# Altium PCB PCB_A1.PcbDoc (part 1 of 2)
Units mil, origin at the board's own origin, x right, y up, seen from the top; angles counter-clockwise.
Board outline 2000 x 2550 mil, 4 copper layers (Top Layer, GND, 3V3, Bottom Layer), stack 61.818 mil thick; 74 components, 52 nets, 287 pads, 163 vias.
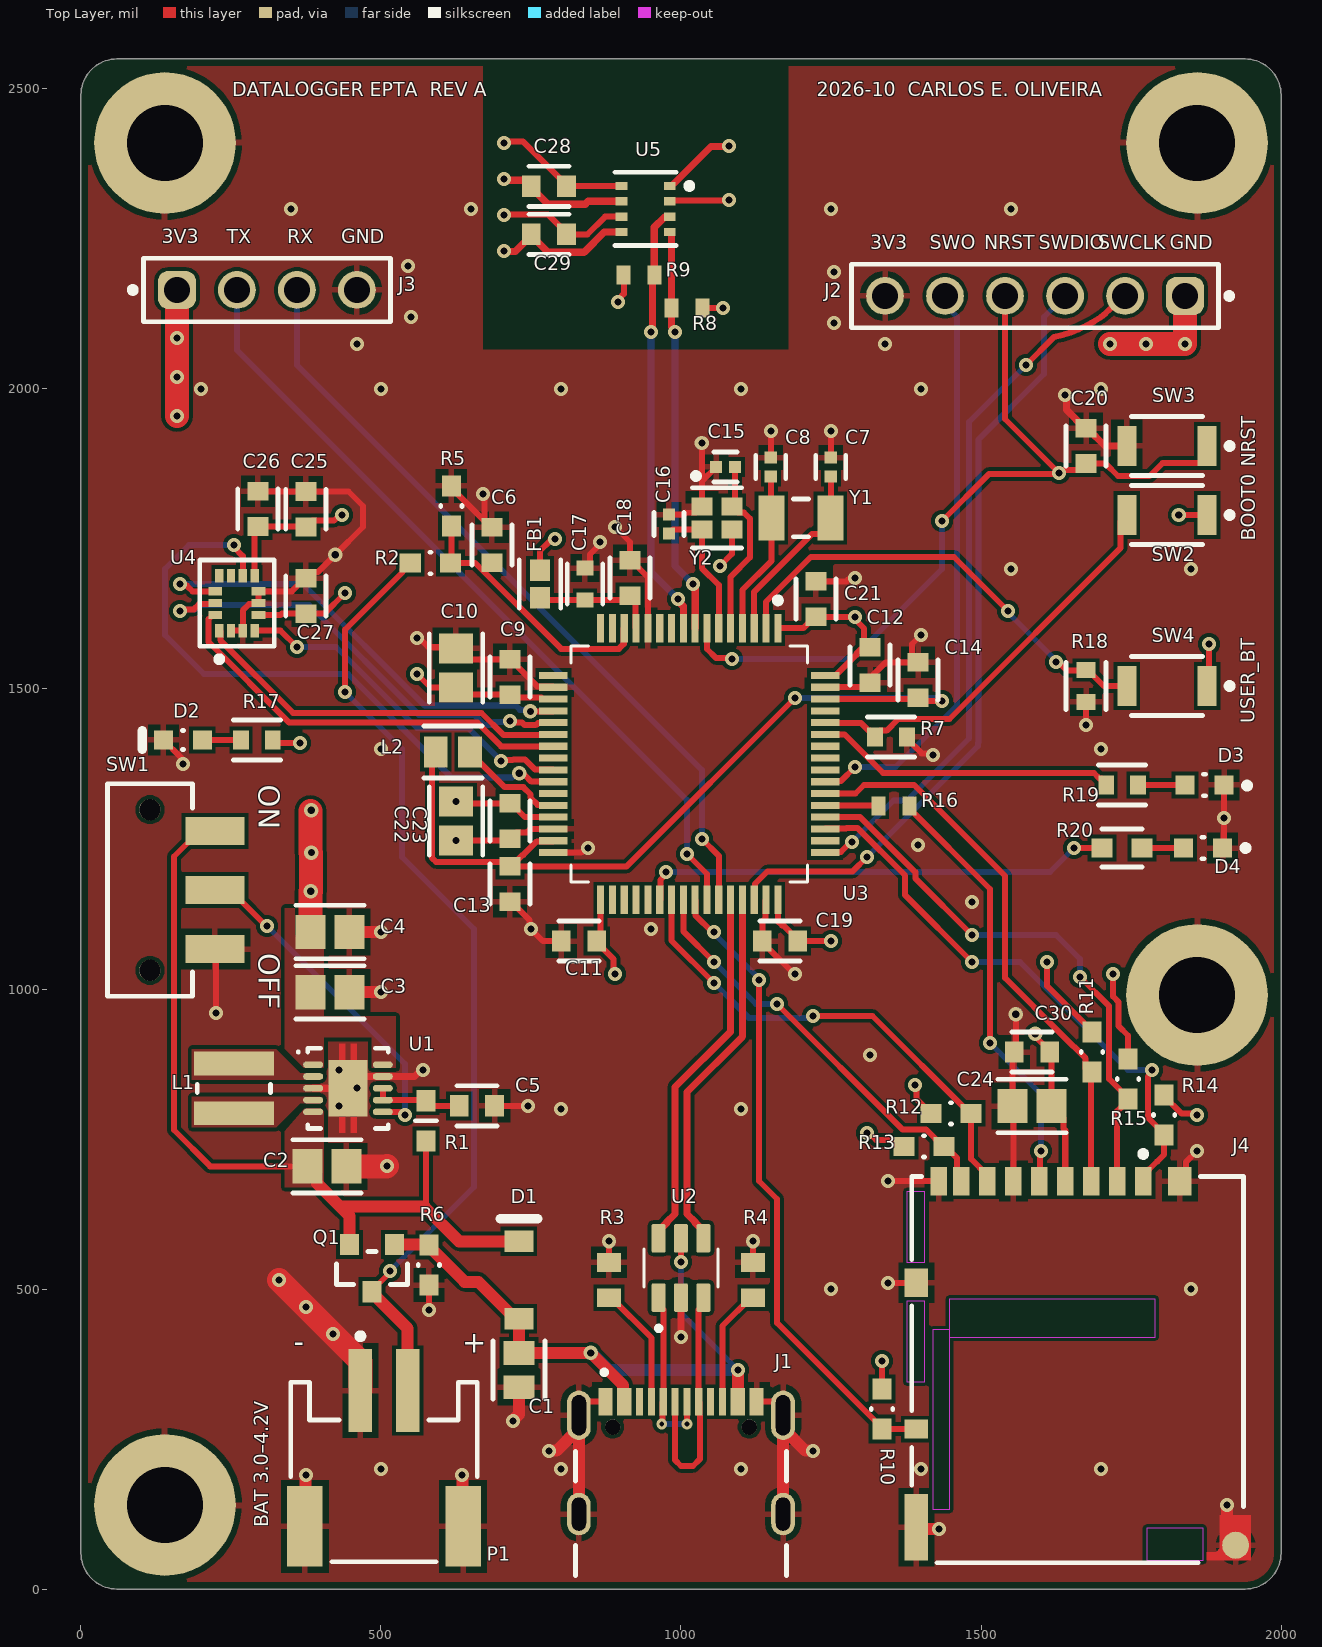
[diagram p0: Top Layer view]
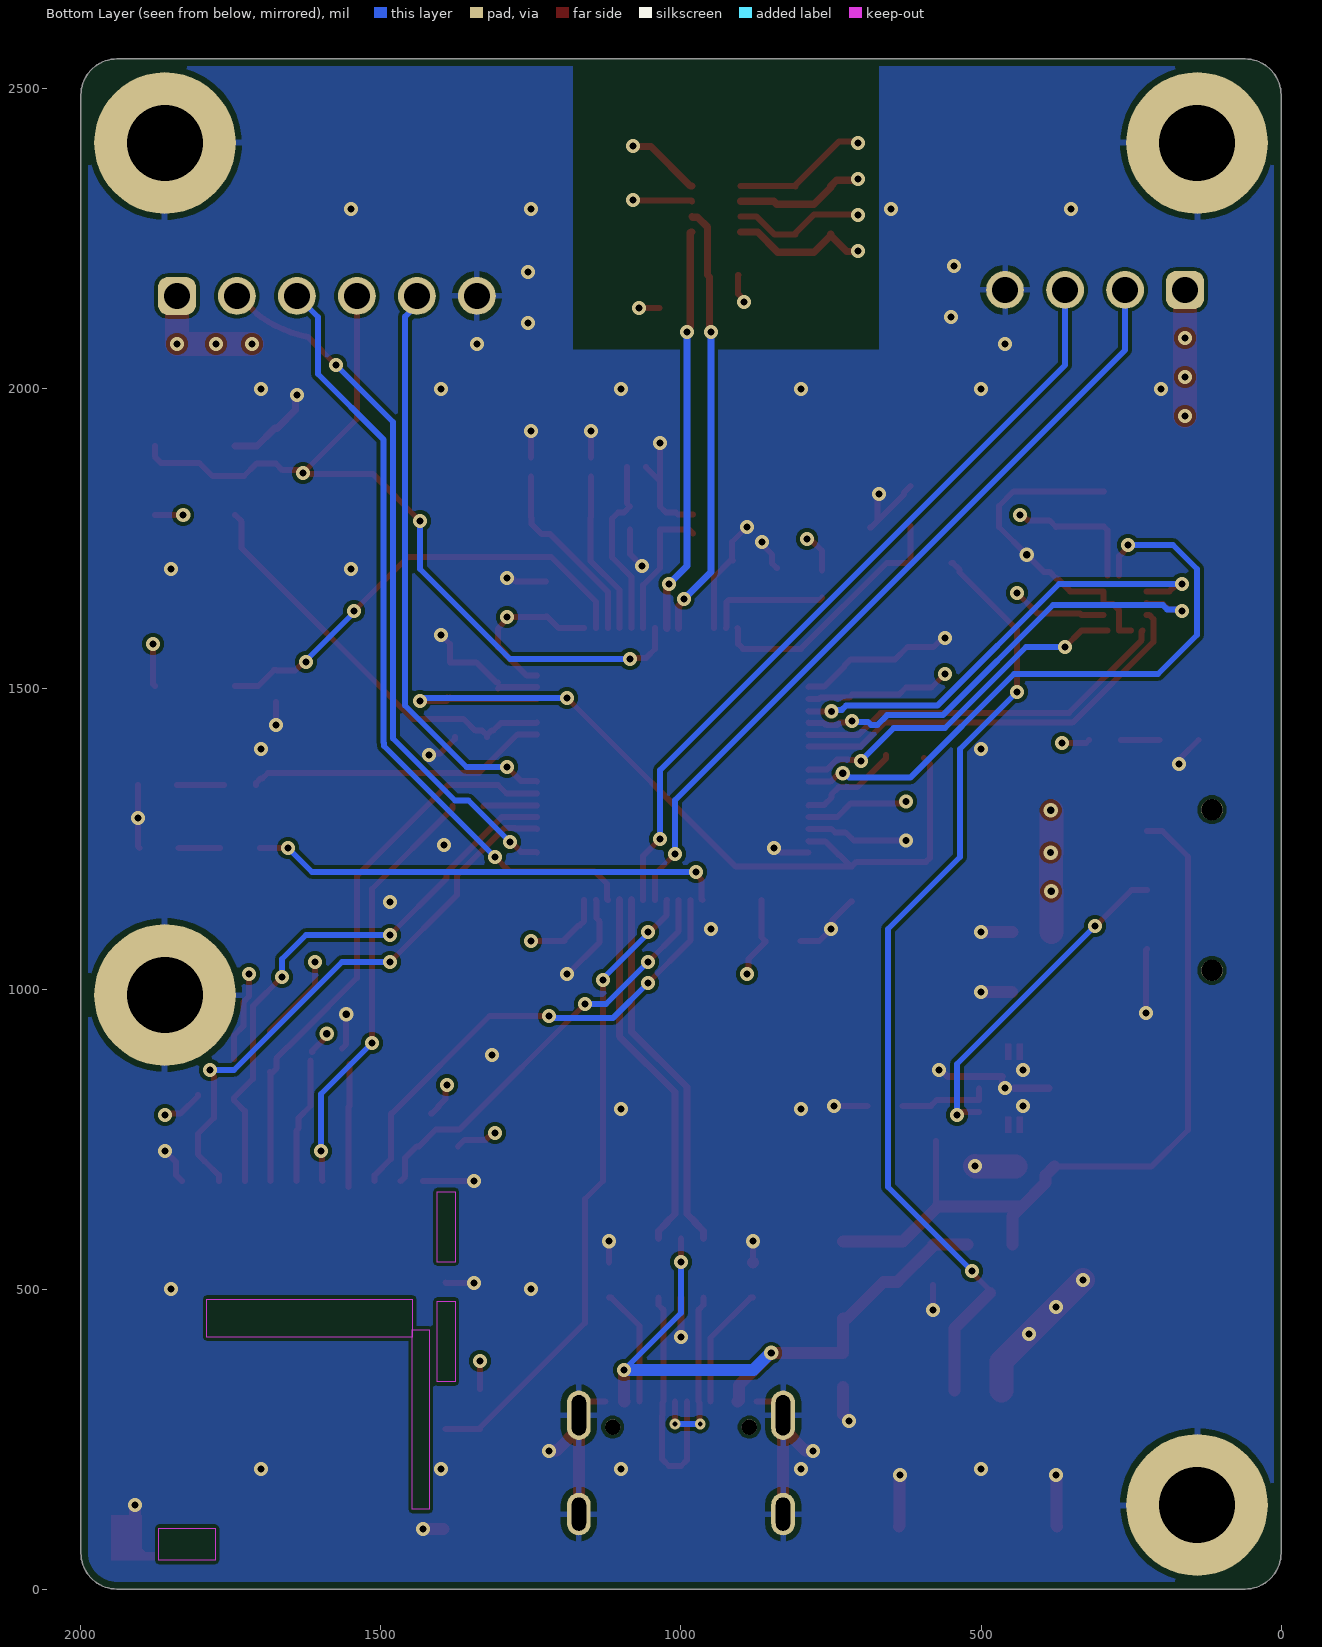
[diagram p1: Bottom Layer view, seen from below]
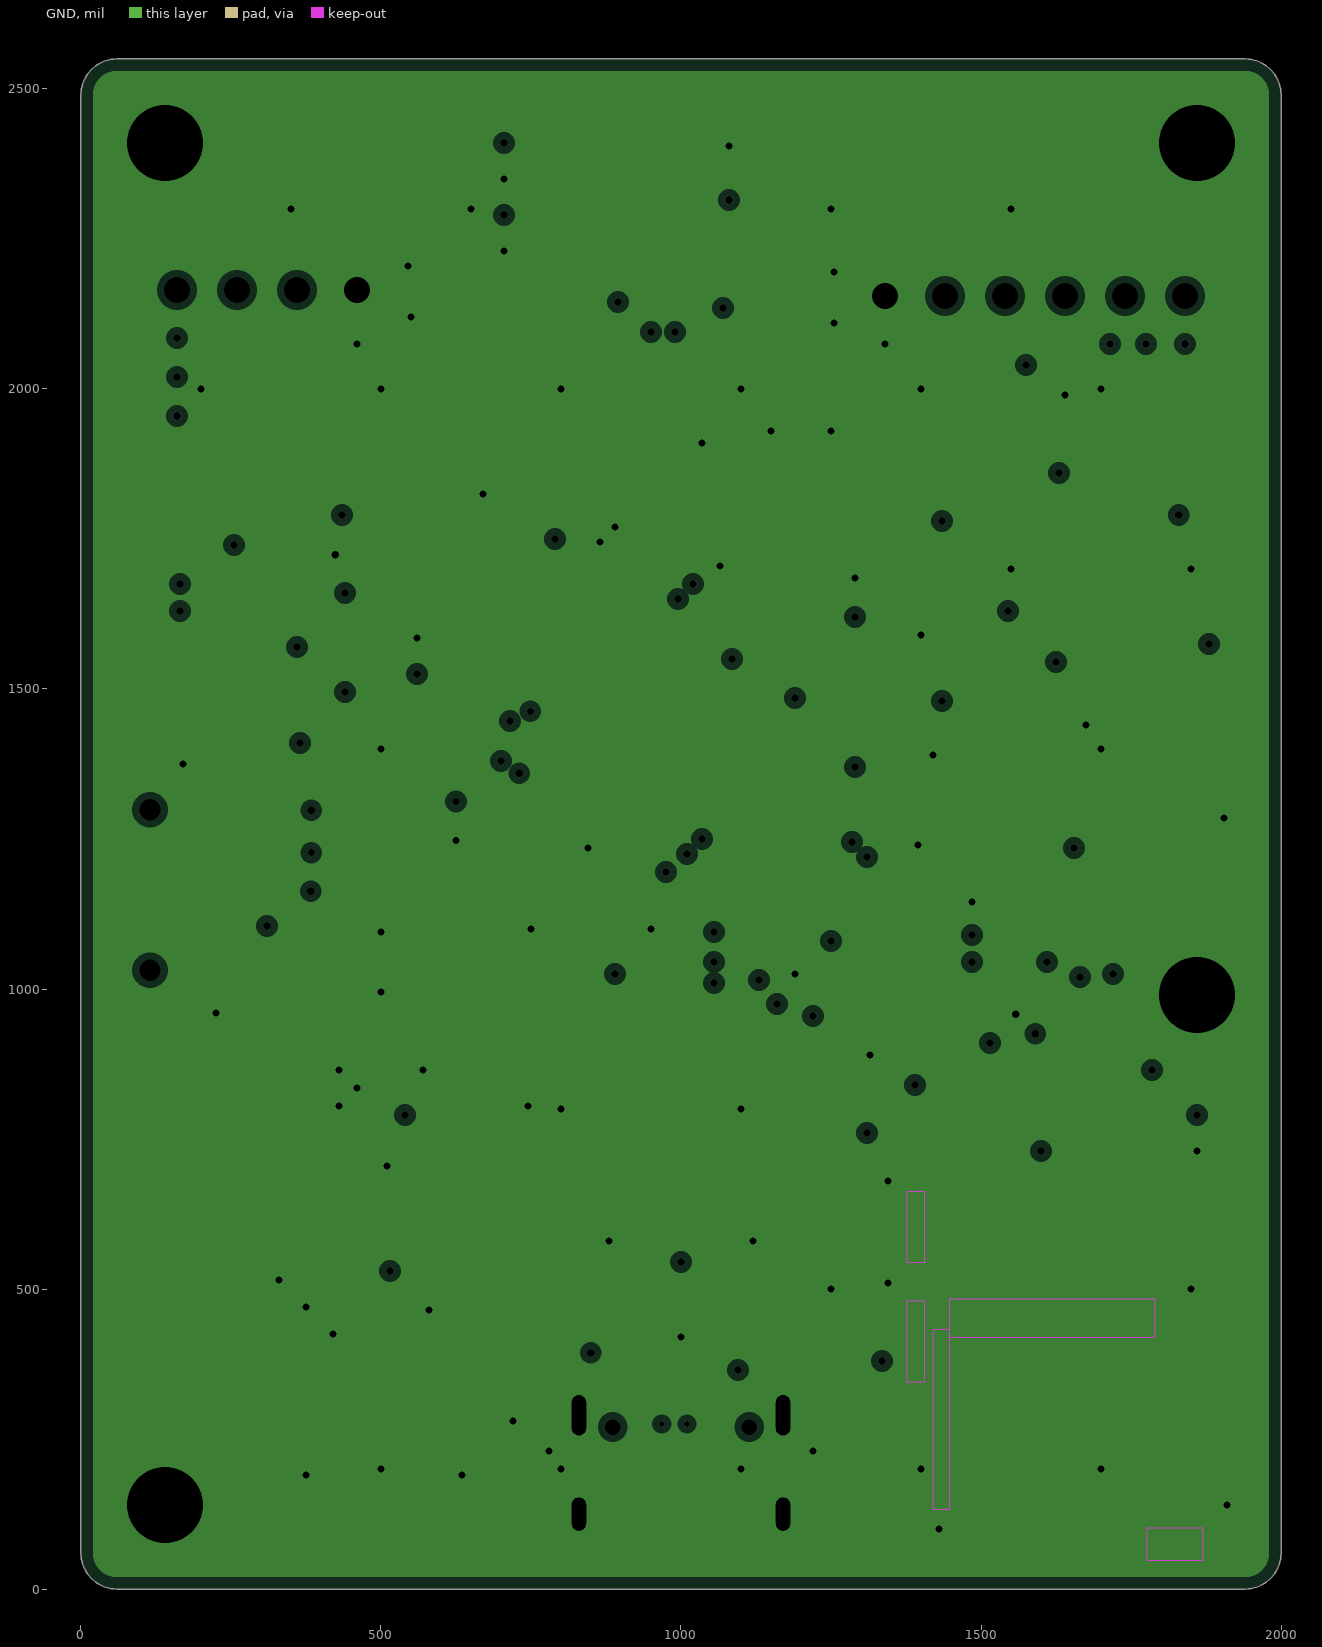
[diagram p2: GND, clearances drawn from the general rule]
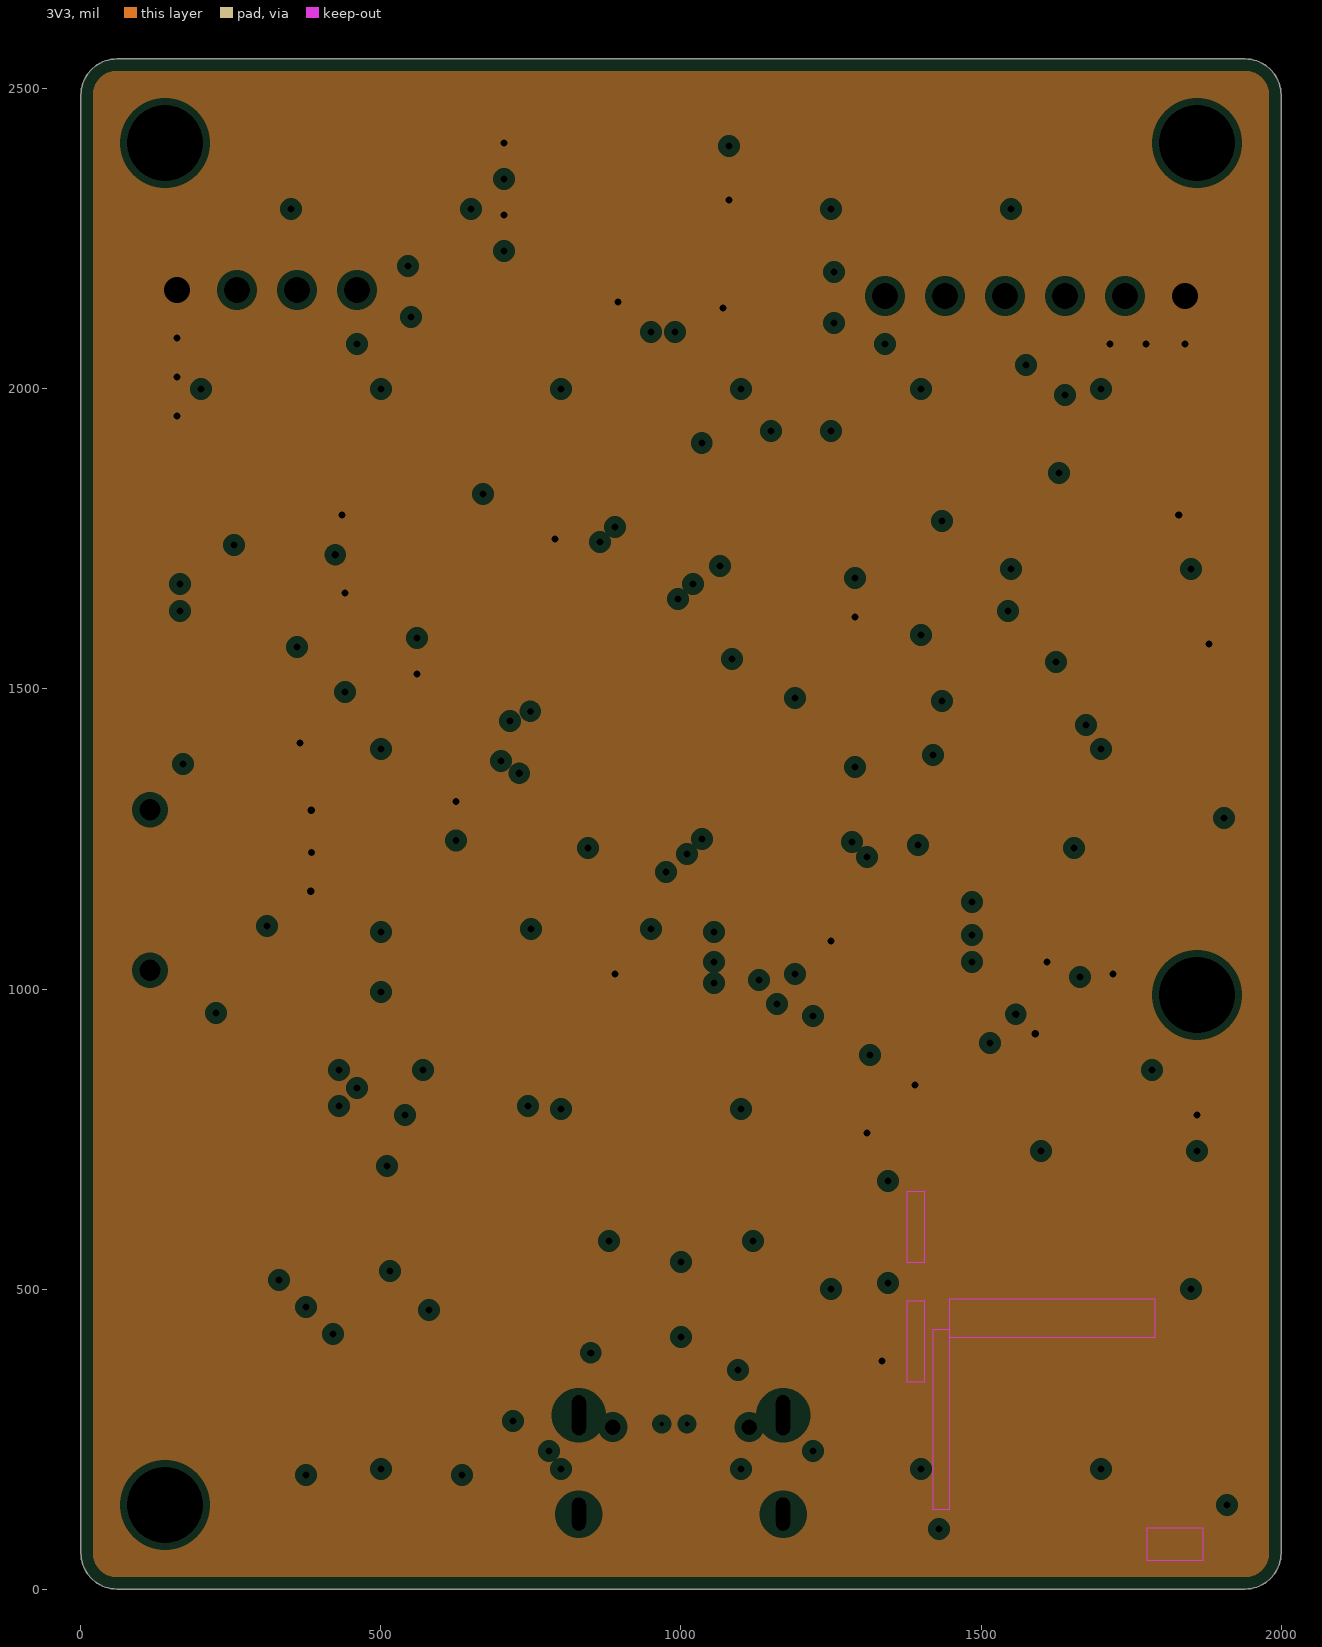
[diagram p3: 3V3, clearances drawn from the general rule]

## Layer stack, top to bottom
Top Solder: solder mask 0.4, Solder Resist, Dk 3.8
Top Layer: signal copper 1.38
Dielectric 1: prepreg 3.94, PP-006, Dk 4.05
GND: plane copper 0.689, net GND
Dielectric 2: dielectric 49.8, FR-4, Dk 4.8
3V3: plane copper 0.689, net 3V3
Dielectric 3: prepreg 3.94, PP-006, Dk 4.05
Bottom Layer: signal copper 1.38
Bottom Solder: solder mask 0.4, Solder Resist, Dk 3.8

## Board outline
0,60 0,2490 cw(c60,2490) 60,2550 1940,2550 cw(c1940,2490) 2000,2490 2000,60 cw(c1940,60) 1940,0 60,0 cw(c60,60)
cut-out: 6372.5,4767.5 6370,4767.5

## Design rules (kind name [scope] priority, off if disabled: settings)
AssemblyTestPointUsage [All] p1 off:
BoardOutlineClearance [All] p1: gap=12 ignorepadtopadclearanceinfootprint=FALSE
Clearance Clearance_Polygon [InPolygon] p1: gap=6 ignorepadtopadclearanceinfootprint=TRUE
Clearance [All] p2: gap=6 ignorepadtopadclearanceinfootprint=TRUE
DiffPairsRouting DiffPair_USB [InDifferentialPairClass('USB_DIFF')] p1: maxlimit=200 minlimit=6 mostfreqgap=8 toplayer_minwidth=8 toplayer_maxwidth=12 toplayer_prefwidth=10 bottomlayer_minwidth=8 bottomlayer_maxwidth=12 bottomlayer_prefwidth=10 maxuncoupledlength=500
DiffPairsRouting [All] p2: maxlimit=200 minlimit=6 mostfreqgap=8 toplayer_minwidth=8 toplayer_maxwidth=12 toplayer_prefwidth=10 bottomlayer_minwidth=8 bottomlayer_maxwidth=12 bottomlayer_prefwidth=10 maxuncoupledlength=500
FabricationTestPointUsage [All] p1 off: valid=0 allowmultiple=FALSE
HoleSize HoleSize_USB [IsVia and InNet('USB_DM_NET')] p1: absolutevalues=TRUE maxlimit=12 minlimit=8 maxpercent=80.000 minpercent=20.000
HoleSize [All] p2: absolutevalues=TRUE maxlimit=248 minlimit=12 maxpercent=80.000 minpercent=20.000
HoleToHoleClearance [All] p1: gap=20 allowstackedmicrovias=TRUE
MinimumAnnularRing MinimumAnnularRing_USB [IsVia and InNet('USB_DM_NET')] p1: minimumring=5
MinimumAnnularRing [All] p2: minimumring=6
MinimumSolderMaskSliver MinimumSolderMaskSliver_FinePitch [InComponent('U3') or InComponent('U1') or InComponent('U4') or InComponent('U5') or InComponent('J1') or InComponent('Y2')] p1: minsoldermaskwidth=0
MinimumSolderMaskSliver MinimumSolderMaskSliver_U5A5 [HasFootprint('LQFP64-5W_MFG')] p2: minsoldermaskwidth=3
MinimumSolderMaskSliver [All] p3: minsoldermaskwidth=8
PlaneClearance [All] p1: clearance=12
PlaneConnect PlaneConnect_Vias [IsVia] p1: planeconnectstyle=Direct reliefexpansion=20 reliefentries=4 reliefconductorwidth=10 reliefairgap=10
PlaneConnect [All] p2: planeconnectstyle=Relief reliefexpansion=20 reliefentries=4 reliefconductorwidth=10 reliefairgap=10
PolygonConnect PolygonConnect_Vias [IsVia] p1: connectstyle=Direct reliefconductorwidth=10 reliefentries=4 polygonreliefangle="90 Angle" airgapwidth=10
PolygonConnect PolygonConnect_Power [InNet('VSYS') or InNet('NetL1_1') or InNet('NetL1_2') or InNet('3V3') or InComponent('U1') or InComponent('L1')] p2: connectstyle=Direct reliefconductorwidth=10 reliefentries=4 polygonreliefangle="90 Angle" airgapwidth=10
PolygonConnect [All] p3: connectstyle=Relief reliefconductorwidth=10 reliefentries=4 polygonreliefangle="90 Angle" airgapwidth=10
RoutingVias RoutingVias_USB [IsVia and InNet('USB_DM_NET')] p1: holewidth=8 width=18 viastyle="Through Hole" minholewidth=8 minwidth=18 maxholewidth=8 maxwidth=18
RoutingVias [All] p2: holewidth=12 width=24 viastyle="Through Hole" minholewidth=12 minwidth=24 maxholewidth=12 maxwidth=24
SilkToSilkClearance [All] p1: silktosilkclearance=6
SilkToSolderMaskClearance [IsPad] p1: minsilkscreentomaskgap=6 clearancetoexposedcopper=TRUE
SolderMaskExpansion Tented_Vias [IsVia] p1: expansion=0 istentingtop=TRUE useseparateexpansions=TRUE expansionbottom=0 istentingbottom=TRUE
SolderMaskExpansion [All] p2: expansion=2 istentingtop=FALSE useseparateexpansions=TRUE expansionbottom=2 istentingbottom=FALSE
SupplyNets "Schematic Supply Nets_5" [InNet('3V3')] p1: voltage=0.000
SupplyNets "Schematic Supply Nets_4" [InNet('VBUS')] p2: voltage=0.000
SupplyNets "Schematic Supply Nets_2" [InNet('VBAT')] p3: voltage=0.000
SupplyNets "Schematic Supply Nets_1" [InNet('GND')] p4: voltage=0.000
SupplyNets "Schematic Supply Nets" [InNet('VSYS')] p5: voltage=0.000
Width Width_Power [InNet('VBUS') or InNet('VSYS') or InNet('VBAT') or InNet('3V3')] p1: maxlimit=100 minlimit=10 preferedwidth=20 minimp=50.000000 maximp=50.000000 favimp=50.000000
Width [All] p2: maxlimit=100 minlimit=6 preferedwidth=10 minimp=50.000000 maximp=50.000000 favimp=50.000000
20 further rules are at their usual default settings.

## Classes and differential pairs
differential pair class USB_DIFF: USB USB_CONN
component class SENSORS: C25 C26 C27 C28 C29 R8 R9 U4 U5
component class POWER: C1 C2 C3 C4 C5 C6 D1 J1 L1 Q1 R1 R2 R3 R4 R5 R6 SW1 U1 U2
component class microSD: C24 C30 J4 R10 R11 R12 R13 R14 R15 R16
component class MCU_U5A5: C7 C8 C9 C10 C11 C12 C13 C14 C15 C16 C17 C18 C19 C20 C21 C22 C23 FB1 J2 J3 L2 R7 SW2 SW3 U3 Y1 Y2
component class INTERFACE: D2 D3 D4 R17 R18 R19 R20 SW4
differential pair USB_CONN: +USB_DP_NET -USB_DM_NET
differential pair USB: +USB_DP -USB_DM

## Components (designator, comment, footprint, x,y, rotation, side; value= is the part's Value field where it differs from the comment)
C1 "GRM219R61E475KA73D" FP-GRM219-0_15-0_1-IPC_C 730,365 r270 top
C2 "GRM21BZ71E106KE15K" FP-GRM21B-0_2-e0_2_0_7-IPC_B 410,704.53 r0 top value=10uF
C3 "GRM21BZ71E106KE15K" FP-GRM21B-0_2-e0_2_0_7-IPC_B 415,994.53 r0 top value=10uF
C4 "GRM21BZ71E106KE15K" FP-GRM21B-0_2-e0_2_0_7-IPC_B 415,1095 r0 top value=10uF
C5 "CC0603KRX7R9BB104" FP-CC0603-DA-MFG 660,805.32 r0 top value="100 nF"
C6 "CC0603KRX7R9BB104" FP-CC0603-DA-MFG 685,1740 r90 top value="100 nF"
C7 "C0402C829D5GACTU" FP-C0402-BB-MFG 1249.68,1870 r90 top value="8.2 pF"
C8 "C0402C829D5GACTU" FP-C0402-BB-MFG 1149.68,1870 r90 top value="8.2 pF"
C9 "CC0603KRX7R9BB104" FP-CC0603-DA-MFG 715,1520 r90 top value="100 nF"
C10 "GRM21BZ71E106KE15K" FP-GRM21B-0_2-e0_2_0_7-IPC_B 625,1535 r90 top value=10uF
C11 "CC0603KRX7R9BB104" FP-CC0603-DA-MFG 830,1080 r180 top value="100 nF"
C12 "CC0603KRX7R9BB104" FP-CC0603-DA-MFG 1315,1540 r270 top value="100 nF"
C13 "CC0603KRX7R7BB225" FP-CC0603-DA-MFG 715,1175 r270 top value="2.2 uF"
C14 "CC0603KRX7R7BB225" FP-CC0603-DA-MFG 1395,1515 r90 top value="2.2 uF"
C15 "C0402C100C5GACTU" FP-C0402-BB-MFG 1074.25,1870 r180 top value="10 pF"
C16 "C0402C100C5GACTU" FP-C0402-BB-MFG 980,1775 r90 top value="10 pF"
C17 "GCM188R71E105KA64D" FP-GCM188-0_1-MFG 840,1675 r90 top
C18 "CC0603KRX7R9BB104" FP-CC0603-DA-MFG 915,1685 r90 top value="100 nF"
C19 "CC0603KRX7R9BB104" FP-CC0603-DA-MFG 1165,1080 r180 top value="100 nF"
C20 "CC0603KRX7R9BB104" FP-CC0603-DA-MFG 1675,1905 r90 top value="100 nF"
C21 "CC0603KRX7R9BB104" FP-CC0603-DA-MFG 1225,1650 r90 top value="100 nF"
C22 "GRM21BZ71E106KE15K" FP-GRM21B-0_2-e0_2_0_7-IPC_B 625,1280 r270 top value=10uF
C23 "CC0603KRX7R9BB104" FP-CC0603-DA-MFG 715,1280 r270 top value="100 nF"
C24 "GRM21BZ71E106KE15K" FP-GRM21B-0_2-e0_2_0_7-IPC_B 1585,805 r180 top value=10uF
C25 "CC0603KRX7R7BB225" FP-CC0603-DA-MFG 375,1799.53 r270 top value="2.2 uF"
C26 "CC0603KRX7R9BB104" FP-CC0603-DA-MFG 295,1800 r90 top value="100 nF"
C27 "CC0603KRX7R9BB104" FP-CC0603-DA-MFG 375,1655 r90 top value="100 nF"
C28 "CC0603KRX7R9BB104" FP-CC0603-DA-MFG 780,2337.72 r180 top value="100 nF"
C29 "CC0603KRX7R9BB104" FP-CC0603-DA-MFG 780,2257.72 r180 top value="100 nF"
C30 "CC0603KRX7R9BB104" FP-CC0603-DA-MFG 1585,895 r180 top value="100 nF"
D1 "B5819W" MCC-SOD123_V 730,515 r90 top
D2 "APT1608SGC" KING-APT1608SGC_V 170,1415 r180 top
D3 "APT1608EC" FP-APT1608EC-MFG 1872.52,1340 r180 top
D4 "APT1608QBC/D" FP-APT1608QBC-D-MFG 1870,1235 r180 top
FB1 "BLM18PG221SH1D" FP-BLM18-0_15-t0_8-IPC_C 765,1675 r270 top
J1 "USB4105-GF-A" GCT_USB4105-GF-A 1000,125 r0 top
J2 "61300611121" 61300611121 1590,2155 r180 top
J3 "61300411121" 61300411121 310,2165 r0 top
J4 "DM3AT-SF-PEJM5" FP-DM3AT-SF-PEJM5-MFG 1661.06,365.87 r0 top
L1 "VLS3012HBX-2R2M" FP-VLS3012HBX-MFG 255,834.53 r90 top value=2.2uH
L2 "LQM21PN2R2MGHL" FP-LQM21PH_G0-IPC_C 620,1395 r0 top
P1 "S2B-PH-SM4-TB(LF)(SN)" "JST- S2B-PH-SM4-TB(LF)(SN)-2_V" 505,195 r0 top
Q1 "DMG2305UX-13" FP-SOT23-MFG 485,535 r270 top
R1 "RC0603FR-07100RL" FP-RC0603-0_55-MFG 575,780.32 r90 top
R2 "RC0603FR-07100KL" FP-RC0603-0_55-MFG 582.28,1710 r0 top
R3 "RC0603FR-075K1L" RESC1608X55X25ML10T15 880,515 r90 top value=5,1k
R4 "RC0603FR-075K1L" RESC1608X55X25ML10T15 1120,515 r90 top value=5,1k
R5 "RC0603FR-07100KL" FP-RC0603-0_55-MFG 617.28,1805 r90 top
R6 "RC0603FR-07100KL" FP-RC0603-0_55-MFG 580,540 r270 top
R7 "RC0603FR-0710KL" FP-RC0603-0_55-IPC_C 1350,1420 r0 top
R8 "RC0603FR-074K7L" RESC1608X55X25LL10T15 1010,2135 r0 top
R9 "RC0603FR-074K7L" RESC1608X55X25LL10T15 930,2190 r0 top
R10 "RC0603FR-0747KL" FP-RC0603FR-0747KL-MFG 1335,300 r90 top
R11 "RC0603FR-0747KL" FP-RC0603FR-0747KL-MFG 1685,895 r90 top
R12 "RC0603FR-0747KL" FP-RC0603FR-0747KL-MFG 1450,792.72 r180 top
R13 "RC0603FR-0747KL" FP-RC0603FR-0747KL-MFG 1405,737.72 r180 top
R14 "RC0603FR-0747KL" FP-RC0603FR-0747KL-MFG 1805,790 r90 top
R15 "RC0603FR-0747KL" FP-RC0603FR-0747KL-MFG 1745,850 r90 top
R16 "RC0603FR-0733RL" RESC1608X55X25LL10T15 1355,1305 r180 top
R17 "RC0603FR-071KL" FP-RC0603-0_55-IPC_C 293.36,1415 r180 top
R18 "RC0603FR-0710KL" FP-RC0603-0_55-IPC_C 1675,1505 r270 top
R19 "RC0603FR-071KL" FP-RC0603-0_55-IPC_C 1735,1340 r0 top
R20 "RT0603FRE07330RL" FP-RT0603-MFG 1735,1235 r0 top value=330Ω
SW1 "JS102011SAQN" FP-JS102011SAQN-MFG 115,1165 r270 top
SW2 "B3U-1000P" OMRON-B3U-1000_V 1810,1790 r180 top
SW3 "B3U-1000P" OMRON-B3U-1000_V 1810,1905 r180 top
SW4 "B3U-1000P" OMRON-B3U-1000_V 1810,1505 r180 top
U1 "TPS63001DRCRG4" DRC10-2400X1650TP 445,834.53 r0 top
U2 "USBLC6-2SC6" SOT95P280X145-6N 1000,535 r90 top
U3 "STM32U5A5RJT6Q" LQFP64-5W_MFG 1013.78,1375 r270 top
U4 "LSM6DSOXTR" FP-LGA-14L-DM00249496-MFG 260,1643.13 r90 top
U5 "BME280" FP-BME280-MFG 941.06,2300 r0 top
Y1 "ABS07-32.768KHZ-7-T" FP-ABS07-MFG 1199.68,1785 r180 top
Y2 "ABM11W-16.0000MHZ-8-K1Z-T3" FP-ABM11W-MFG 1060,1785 r180 top

## Footprints (in the part's own frame and the unit in brackets; to place one, negate y for a bottom-side part, rotate by r counter-clockwise, add the part's x,y. Pads: shape width x height; smd on the part's side, far side on the other; paste and mask are expansions set on the pad)
61300411121 [mm] "Pin Header, pitch 2.54 mm, THT, Vertical, single row, 4p"
  rrect50% 1.6x1.6 hole 1.1: 1(-3.81,0)
  round 1.6 hole 1.1: 2(-1.27,0) 3(1.27,0) 4(3.81,0)
  silkscreen extent -5.8,-1.35 5.23,1.35, body extent -5.08,-1.27 5.08,1.27, height 8.57
61300611121 [mm] "Pin Header, pitch 2.54 mm, THT, Vertical, single row, 6p"
  rrect50% 1.6x1.6 hole 1.1: 1(-6.35,0)
  round 1.6 hole 1.1: 2(-3.81,0) 3(-1.27,0) 4(1.27,0) 5(3.81,0) 6(6.35,0)
  silkscreen extent -8.34,-1.35 7.77,1.35, body extent -7.62,-1.27 7.62,1.27, height 8.57
DRC10-2400X1650TP [mm] "SON, 10-Leads, Body 3x3mm, Pitch 0.5mm, Thermal Pad 2.4x1.65mm, TI Recommended"
  oval 0.85x0.28 smd paste-0.025 mask+0.07: 1(-1.475,1) 2(-1.475,0.5) 3(-1.475,0) 4(-1.475,-0.5) 5(-1.475,-1) 6(1.475,-1) 7(1.475,-0.5) 8(1.475,0) 9(1.475,0.5) 10(1.475,1)
  rect 1.65x2.4 smd paste-0.825 mask+0.07: 11(0,0)
  Top Layer region: -0.39,1.2 -0.11,1.2 -0.11,1.9 -0.39,1.9
  Top Layer region: 0.39,1.9 0.11,1.9 0.11,1.2 0.39,1.2
  Top Layer region: -0.39,-1.9 -0.11,-1.9 -0.11,-1.2 -0.39,-1.2
  Top Layer region: 0.39,-1.2 0.11,-1.2 0.11,-1.9 0.39,-1.9
  silkscreen extent -2.15,-1.7 1.7,1.7, body extent -1.55,-1.55 1.55,1.55, height 1
FP-ABM11W-MFG [mm]
  rect 0.875x0.775 smd paste+0 mask+0: 1(-0.637,-0.487) 2(0.637,-0.487) 3(0.637,0.487) 4(-0.637,0.487)
  silkscreen extent -1.05,-1.9 1.05,1.28, body extent -1.17,-0.97 1.17,0.97, height 0.25
FP-ABS07-MFG [mm]
  rect 1.1x1.9 smd paste+0 mask+0: 1(-1.25,0) 2(1.25,0)
  silkscreen extent -0.33,-0.8 0.33,0.8, body extent -1.9,-1.05 1.9,1.05, height 0.25
FP-APT1608EC-MFG [mm]
  rect 0.8x0.8 smd paste+0 mask+0: 1(-0.825,0) 2(0.825,0)
  silkscreen extent -1.92,-0.45 0.05,0.45, body extent -1.33,-0.55 1.33,0.55, height 0.25
FP-APT1608QBC-D-MFG [mm]
  rect 0.8x0.8 smd paste+0 mask+0: 1(-0.825,0) 2(0.825,0)
  silkscreen extent -1.92,-0.45 0.05,0.45, body extent -1.33,-0.55 1.33,0.55, height 0.25
FP-BLM18-0_15-t0_8-IPC_C [mil]
  rect 35.67x33.79 smd paste+0 mask+0: 1(-22.68,0) 2(22.68,0)
  silkscreen extent -41,-34 41,34, body extent -44,-23 44,23, height 10
FP-BME280-MFG [mm]
  rect 0.5x0.35 smd paste+0 mask+0: 1(1.025,0.975) 2(1.025,0.325) 3(1.025,-0.325) 4(1.025,-0.975) 5(-1.025,-0.975) 6(-1.025,-0.325) 7(-1.025,0.325) 8(-1.025,0.975)
  silkscreen extent -1.3,-1.55 1.97,1.55
FP-C0402-BB-MFG [mm]
  rect 0.52x0.52 smd paste+0 mask+0: 1(-0.4,0) 2(0.4,0)
  silkscreen extent -0.5,-0.64 0.5,0.64, body extent -0.8,-0.4 0.8,0.4, height 0.25
FP-CC0603-DA-MFG [mm]
  rect 0.8x0.9 smd paste+0 mask+0: 1(-0.75,0) 2(0.75,0)
  silkscreen extent -0.85,-0.85 0.85,0.85, body extent -1.35,-0.75 1.35,0.75, height 0.25
FP-DM3AT-SF-PEJM5-MFG [mm]
  rect 0.7x1.2 smd paste+0 mask+0: 1(2.775,7.975) 2(1.675,7.975) 3(0.575,7.975) 4(-0.525,7.975) 5(-1.625,7.975) 6(-2.725,7.975) 7(-3.825,7.975) 8(-4.925,7.975) 9(-5.875,7.975)
  rect 1x0.8 smd paste+0 mask+0: 10(-6.825,-2.525)
  rect 1x1.2 smd paste+0 mask+0: 11(4.325,7.975) 12(-6.825,3.675)
  rect 1x2.8 smd paste+0 mask+0: 13(-6.825,-6.675)
  round 1.145 smd paste+0 mask+0: 14(6.689,-7.439)
  Top Layer region: 6.025,-6.175 7.325,-6.175 7.325,-8.075 5.475,-8.075 5.475,-7.725 5.875,-7.725 6.025,-7.575 6.025,-6.175
  Keep-Out Layer region: 2.925,-8.075 5.307,-8.075 5.307,-6.725 2.925,-6.725
  Keep-Out Layer region: -7.225,-0.525 -6.475,-0.525 -6.475,2.899 -7.225,2.899
  Keep-Out Layer region: -7.225,4.55 -6.475,4.55 -6.475,7.525 -7.225,7.525
  Keep-Out Layer region: -6.125,-5.925 -5.425,-5.925 -5.425,1.675 -6.125,1.675
  Keep-Out Layer region: -5.425,1.375 3.275,1.375 3.275,2.975 -5.425,2.975
  silkscreen extent -7.02,-8.18 7.02,9.25, body extent -7.42,-8.27 7.42,8.67, height 0.25
FP-GCM188-0_1-MFG [mm]
  rect 0.65x0.7 smd paste+0 mask+0: 1(-0.675,0) 2(0.675,0)
  silkscreen extent -0.85,-0.75 0.85,0.75, body extent -1.1,-0.55 1.1,0.55, height 0.25
FP-GRM21B-0_2-e0_2_0_7-IPC_B [mil]
  rect 49.4x57.33 smd paste+0 mask+0: 1(-32.51,0) 2(32.51,0)
  silkscreen extent -57,-44 57,44, body extent -67,-39 67,39, height 10
FP-GRM219-0_15-0_1-IPC_C [mil]
  rect 39.6x51.5 smd paste+0 mask+0: 1(-28.59,0) 2(28.59,0)
  silkscreen extent -48,-43 48,43, body extent -52,-31 52,31, height 10
FP-JS102011SAQN-MFG [mm]
  rect 1.2x2.5 smd paste+0 mask+0: 1(-2.5,2.75) 2(0,2.75) 3(2.5,2.75)
  round 0.9 hole 0.9 unplated paste-2539.97 mask+0: ""(-3.4,0) ""(3.4,0)
  silkscreen extent -4.5,-1.8 4.5,1.8, body extent -4.6,-3.9 4.6,4.1, height 0.25
FP-LGA-14L-DM00249496-MFG [mm]
  rect 0.575x0.35 smd paste+0 mask+0: 1(-1.162,0.75) 2(-1.162,0.25) 3(-1.162,-0.25) 4(-1.162,-0.75) 8(1.162,-0.75) 9(1.162,-0.25) 10(1.162,0.25) 11(1.162,0.75)
  rect 0.35x0.575 smd paste+0 mask+0: 5(-0.5,-0.913) 6(0,-0.913) 7(0.5,-0.913) 12(0.5,0.913) 13(0,0.913) 14(-0.5,0.913)
  silkscreen extent -2.5,-1.58 1.83,1.58, body extent -2.05,-1.8 2.05,1.8, height 0.25
FP-LQM21PH_G0-IPC_C [mil]
  rect 39.61x51.5 smd paste+0 mask+0: 1(-28.59,0) 2(28.59,0)
  silkscreen extent -48,-43 48,43, body extent -52,-31 52,31, height 10
FP-RC0603-0_55-IPC_C [mil]
  rect 25.93x31.97 smd paste+0 mask+0: 1(-26.64,0) 2(26.64,0)
  silkscreen extent -40,-33 40,33, body extent -44,-22 44,22, height 10
FP-RC0603-0_55-MFG [mm]
  rect 0.9x0.8 smd paste+0 mask+0: 1(-0.85,0) 2(0.85,0)
  silkscreen extent 0,-0.45 0,0.45, body extent -1.4,-0.55 1.4,0.55, height 0.25
FP-RC0603FR-0747KL-MFG [mm]
  rect 0.9x0.8 smd paste+0 mask+0: 1(-0.85,0) 2(0.85,0)
  silkscreen extent -0.03,-0.45 0.03,0.45, body extent -1.4,-0.55 1.4,0.55, height 0.25
FP-RT0603-MFG [mm]
  rect 0.9x0.8 smd paste+0 mask+0: 1(-0.85,0) 2(0.85,0)
  silkscreen extent -0.85,-0.81 0.86,0.8, body extent -1.4,-0.55 1.4,0.55, height 0.25
FP-SOT23-MFG [mm]
  rect 0.9x0.8 smd paste+0 mask+0: 1(-1,0.95) 2(-1,-0.95) 3(1,0)
  silkscreen extent -0.7,-1.5 0.7,1.5, body extent -1.55,-1.6 1.55,1.6, height 0.25
FP-VLS3012HBX-MFG [mm]
  rect 1x3.4 smd paste+0 mask+0: 1(-1.05,0) 2(1.05,0)
  silkscreen extent -0.18,-1.55 0.18,1.55, body extent -1.65,-1.8 1.65,1.8, height 0.25
GCT_USB4105-GF-A [mm]
  rect 0.6x1.15 smd mask+0.05: A1_B12(-3.2,4.755) A4_B9(-2.4,4.755) B1_A12(3.2,4.755) B4_A9(2.4,4.755)
  rect 0.3x1.15 smd mask+0.05: A5(-1.25,4.755) A6(-0.25,4.755) A7(0.25,4.755) A8(1.25,4.755) B5(1.75,4.755) B6(0.75,4.755) B7(-0.75,4.755) B8(-1.75,4.755)
  oval 1x2.1 hole 0.6 slot 1.7 at 90 deg: SH1(-4.32,4.18) SH2(4.32,4.18)
  oval 1x1.8 hole 0.6 slot 1.4 at 90 deg: SH3(-4.32,0) SH4(4.32,0)
  round 0.65 hole 0.65 unplated: ""(-2.89,3.68) ""(2.89,3.68)
  silkscreen extent -4.47,-2.6 4.47,6.1, body extent -4.47,-2.6 4.47,5.11, height 3.31
"JST- S2B-PH-SM4-TB(LF)(SN)-2_V" [mm] "SMD, 2-Leads, Body 7.9x7.6mm, Pitch 2mm"
  rect 1x3.5 smd: 1(-1,3.45) 2(1,3.45)
  rect 1.5x3.4 smd: MP1(-3.35,-2.3) MP2(3.35,-2.3)
  silkscreen extent -3.95,-3.8 3.95,5.87, body extent -3.95,-3.8 3.95,4.8, height 5.6
KING-APT1608SGC_V [mm] "SMD, 2-Leads, Body 0.8x1.6mm"
  rect 0.8x0.8 smd: 1(-0.825,0) 2(0.825,0)
  silkscreen extent -0.03,-0.4 1.73,0.4, body extent -0.8,-0.4 0.81,0.4, height 0.76
LQFP64-5W_MFG [mm] "Recommended Land Pattern"
  rect 1.2x0.3 smd paste+0 mask+0: 1(-5.75,3.75) 2(-5.75,3.25) 3(-5.75,2.75) 4(-5.75,2.25) 5(-5.75,1.75) 6(-5.75,1.25) 7(-5.75,0.75) 8(-5.75,0.25) 9(-5.75,-0.25) 10(-5.75,-0.75) 11(-5.75,-1.25) 12(-5.75,-1.75) 13(-5.75,-2.25) 14(-5.75,-2.75) 15(-5.75,-3.25) 16(-5.75,-3.75) 33(5.75,-3.75) 34(5.75,-3.25) 35(5.75,-2.75) 36(5.75,-2.25) 37(5.75,-1.75) 38(5.75,-1.25) 39(5.75,-0.75) 40(5.75,-0.25) 41(5.75,0.25) 42(5.75,0.75) 43(5.75,1.25) 44(5.75,1.75) 45(5.75,2.25) 46(5.75,2.75) 47(5.75,3.25) 48(5.75,3.75)
  rect 0.3x1.2 smd paste+0 mask+0: 17(-3.75,-5.75) 18(-3.25,-5.75) 19(-2.75,-5.75) 20(-2.25,-5.75) 21(-1.75,-5.75) 22(-1.25,-5.75) 23(-0.75,-5.75) 24(-0.25,-5.75) 25(0.25,-5.75) 26(0.75,-5.75) 27(1.25,-5.75) 28(1.75,-5.75) 29(2.25,-5.75) 30(2.75,-5.75) 31(3.25,-5.75) 32(3.75,-5.75) 49(3.75,5.75) 50(3.25,5.75) 51(2.75,5.75) 52(2.25,5.75) 53(1.75,5.75) 54(1.25,5.75) 55(0.75,5.75) 56(0.25,5.75) 57(-0.25,5.75) 58(-0.75,5.75) 59(-1.25,5.75) 60(-1.75,5.75) 61(-2.25,5.75) 62(-2.75,5.75) 63(-3.25,5.75) 64(-3.75,5.75)
  silkscreen extent -7.05,-5 5,5, body extent -6,-6 6,6, height 1.6
MCC-SOD123_V [mil] "SOD123, 2-Leads, Body 2.7x1.6mm, Height 1.35mm"
  rect 35.98x47.99 smd: 1(-64.5,0) 2(64.5,0)
  silkscreen extent 102,-31 102,31, body extent -53,-31 53,31, height 53
OMRON-B3U-1000_V [mm] "SMD, 2-Leads, Body 3x2.5mm"
  rect 0.8x1.7 smd: 1(-1.7,0) 2(1.7,0)
  silkscreen extent -2.78,-1.25 1.5,1.25, body extent -1.5,-1.25 1.5,1.25, height 1.75
RESC1608X55X25LL10T15 [mm] "Chip Resistor, 2-Leads, Body 1.60x0.80mm, IPC High Density"
  rect 0.6x0.8 smd: 1(-0.65,0) 2(0.65,0)
  body extent -0.85,-0.45 0.85,0.45, height 0.55
RESC1608X55X25ML10T15 [mm] "Chip Resistor, 2-Leads, Body 1.60x0.80mm, IPC Low Density"
  rect 0.8x1 smd: 1(-0.75,0) 2(0.75,0)
  body extent -0.85,-0.45 0.85,0.45, height 0.55
SOT95P280X145-6N [mm]
  rrect25% 1.21x0.59 smd: 1(-1.255,0.95) 2(-1.255,0) 3(-1.255,-0.95) 4(1.255,-0.95) 5(1.255,0) 6(1.255,0.95)
  silkscreen extent -2.65,-1.57 0.81,1.57, body extent -1.4,-1.46 1.4,1.46, height 1.31

## Part data
C1: library part CMP-06035-041247-1, "Chip Multilayer Ceramic Capacitors for General Purpose, 0805, 4.7uF, X5R, 15%, 10%, 25V", Capacitance=4.7uF, Case Code (Imperial)=0805, Case Code (Metric)=2012, Dielectric=X5R, Max Operating Temperature=85°C, Min Operating Temperature=-55°C, Package Quantity=4000, Resistor Type=Ceramic, Tolerance=10%, Voltage Rating=25V, Case/Package=0805, Height=0.85mm, Length=2mm, Material=Ceramic, Mount="Surface Mount", Packaging="Tape and Reel", Termination=SMD/SMT, Thickness=0.037inch, Voltage Rating (DC)=25V, Weight=0.000335oz, Width=1.25mm
C2 C3 C4 C10 C22 C24: library part CMP-06035-042430-1, "Chip Multilayer Ceramic Capacitors for General Purpose, 0805, 10uF, X7R, 15%, 10%, 25V", Case/Package=0805
C5 C6 C9 C11 C12 C18 C19 C20 C21 C23 C26 C27 C28 C29 C30: library part CMP-2100-03601-2, "CAP CER 0.1UF 50V X7R 0603", Capacitance="100 nF", Manufacturer=YAGEO, Package=CC0603-DA, Temperature="-55°C to +125°C", Temperature Characteristic=X7R, Temperature Coefficient=15%, Temperature Range High=+125°C, Temperature Range Low=-55°C, Tolerance=0.1, Voltage="50 V", Automotive=No, Category=Cap, ComponentLink2Description=Datasheet, ComponentLink2URL=http://www.yageo.com/documents/recent/UPY-GPHC_X7R_6.3V-to-50V_18.pdf, Device Class L1="Passive Components", Device Class L2=Capacitors, Device Class L3="Ceramic Capacitors", Digikey Description="CAP CER 0.1UF 50V X7R 0603", Footprint Url=http://www.yageo.com/exep/pages/download/literatures/UPY-C_GEN_24.pdf, Height=0.9mm, Lead Free=Yes, Manufacturer Part Number=CC0603KRX7R9BB104, Material=Ceramic, Mouser Description="Multilayer Ceramic Capacitor, CC Series, 0.1 - F, - 10%, X7R, 50 V, 0603 [1608 Metric]", Octopart=https://octopart.com/cc0603krx7r9bb104-yageo-42244635, RoHS=TRUE, Voltage Rating="50 V"
C7 C8: library part CMP-1034-00609-3, "CAP CER 8.2PF 50V C0G/NP0 0402", Capacitance="8.2 pF", Manufacturer=Kemet, Package=C0402-BB, Temperature="-55°C to +125°C", Temperature Characteristic=C0G, Temperature Coefficient=15%, Temperature Range High=+125°C, Temperature Range Low=-55°C, Tolerance="0.5 pF", Voltage Rating="50 V", Automotive=No, Category=Cap, ComponentLink2Description=Datasheet, ComponentLink2URL=https://content.kemet.com/datasheets/KEM_C1002_X7R_SMD.pdf, Device Class L1="Passive Components", Device Class L2=Capacitors, Device Class L3="Ceramic Capacitors", Digikey Description="CAP CER 8.2PF 50V C0G/NP0 0402", Height=0.55mm, Ipc Land Pattern Name=CAPC10050X50, Lead Free=Yes, Manufacturer Part Number=C0402C829D5GACTU, Material=Ceramic, Mouser Description="Multilayer Ceramic Capacitors MLCC - SMD/SMT 50volts 8.2pF C0G 0.5%", Octopart=https://octopart.com/c0402c829d5gactu-kemet-193081, RoHS=TRUE
C13 C14 C25: library part CMP-03422-001238-1, "CAP CER 2.2UF 16V X7R 0603", Capacitance="2.2 uF", Manufacturer=YAGEO, Package=CC0603-DA, Temperature="-55°C to +125°C", Temperature Characteristic=X7R, Temperature Coefficient=15%, Temperature Range High=+125°C, Temperature Range Low=-55°C, Tolerance=0.1, Voltage="16 V", Automotive=No, Category=Cap, ComponentLink2Description=Datasheet, ComponentLink2URL=http://www.yageo.com/documents/recent/UPY-GPHC_X7R_6.3V-to-50V_18.pdf, Device Class L1="Passive Components", Device Class L2=Capacitors, Device Class L3="Ceramic Capacitors", Digikey Description="CAP CER 2.2UF 16V X7R 0603", Footprint Url=http://www.yageo.com/exep/pages/download/literatures/UPY-C_GEN_24.pdf, Height=0.9mm, Lead Free=Yes, Manufacturer Part Number=CC0603KRX7R7BB225, Material=Ceramic, Mouser Description="Cap Ceramic 2.2uF 16V X7R 10% Pad SMD 0603 125C Automotive T/R", Octopart=https://octopart.com/cc0603krx7r7bb225-yageo-67146440, RoHS=TRUE, Voltage Rating="16 V"
C15 C16: library part CMP-2008-03045-2, "CAP CER 10PF 50V NP0 0402", Capacitance="10 pF", Manufacturer=Kemet, Package=C0402-BB, Temperature="-55°C to +125°C", Temperature Characteristic=C0G, Temperature Coefficient=15%, Temperature Range High=+125°C, Temperature Range Low=-55°C, Tolerance="0.25 pF", Voltage Rating="50 V", Automotive=No, Category=Cap, ComponentLink2Description=Datasheet, ComponentLink2URL=https://content.kemet.com/datasheets/KEM_C1002_X7R_SMD.pdf, Device Class L1="Passive Components", Device Class L2=Capacitors, Device Class L3="Ceramic Capacitors", Digikey Description="CAP CER 10PF 50V NP0 0402", Height=0.55mm, Ipc Land Pattern Name=CAPC10050X50, Lead Free=Yes, Manufacturer Part Number=C0402C100C5GACTU, Material=Ceramic, Mouser Description="Multilayer Ceramic Capacitors MLCC - SMD/SMT 50volts 10pF C0G C0G +/-0.25pF", Octopart=https://octopart.com/c0402c100c5gactu-kemet-125456, RoHS=TRUE
C17: library part CMP-2006-02363-4, Capacitance=1µF, Case Code (Imperial)=0603, Case Code (Metric)=1608, Dielectric=X7R, Manufacturer Lifecycle Status="IN PRODUCTION", Max Operating Temperature=125°C, Min Operating Temperature=-55°C, Ratings=AEC-Q200, Tolerance=10%, Voltage=25V, Case/Package=0603, Depth=800µm, Height=800µm, Lead Free="Lead Free", Length=1.6mm, Lifecycle Status=Production, Material=Ceramic, Mount="Surface Mount", NexarPartId=18909256, Packaging="Cut Tape", Radiation Hardening=No, REACH SVHC="No SVHC", RoHS=Compliant, Schedule B="8532240020, 8532240020", Termination=SMD/SMT, Thickness=889µm, Voltage Rating=25V, Voltage Rating (DC)=25V, Weight=6.293594mg, Width=787.4µm
D1: library part CMP-004-00005-2, "Schottky Barrier Rectifier, 40 V, 1 A, -65 to 125 degC, 2-Pin SOD123, RoHS, Tape and Reel", Case/Package=SOD123, Manufacturer="Micro Commercial Components", Package Description="2-Pin Small Outline Diode, Body 2.7 x 1.6 mm, Height 1.35 mm", Datasheet URL=http://www.mccsemi.com/up_pdf/B5817W-B5819W(SOD-123).pdf, Datasheet Version="Rev. B, 01/2013", Manufacturer URL=http://www.mccsemi.com/, Mounting Technology=SM, Package Reference=SOD123, Package URL=http://www.mccsemi.com/up_pdf/1N4448W(SOD-123).pdf, RoHS Compliant=Unknown
D2: library part CMP-2000-05789-1, "Super Bright Green LED, 62.5 mW, 25 mA, -40 to 85 degC, 2-Pin SMD, RoHS, Tape and Reel", Color=Green, Current - Test=20mA, Manufacturer=Kingbright, Millicandela Rating=15mcd, Package / Case=0603(1608Metric), Package Description="2-Pin Surface Mount Device, Body 0.8 x 1.6 mm", Standard Package=2,000, Voltage - Forward (Vf) (Typ)=2.2V, 3D Model="APT1608x.sldprt /  / APT1608x.pro /  / APT1608x.igs /  / APT1608x.stp", Catalog Drawings="APT1608SeriesTop /  / APT1608SeriesSide", Category=Optoelectronics, Datasheet URL=https://datasheet.ciiva.com/2113/apt1608sgc-2113808.pdf, Datasheet Version="Rev. 16B, 02/2012", Family=LEDIndication-Discrete, Height=0.75mm, Lens Style/Size=RectanglewithFlatTop,1.2mmx0.8mm, Lens Type=Clear, Manufacturer URL=http://www.kingbright.com/, Mounting Technology=SurfaceMount, Mounting Type=SurfaceMount, Online Catalog=0603RectanglewithFlatTopChipLEDs, Other Names=754-1121-2, Package Reference=APT1608SGC, Packaging=Tape&Reel(TR), Size / Dimension=1.60mmLx0.80mmW, Viewing Angle=120°, Wavelength - Dominant=568nm, Wavelength - Peak=565nm
D3: library part CMP-2000-05179-2, "LED RED CLEAR CHIP SMD", Case Code (Imperial)=0603, Case Code (Metric)=1608, Color=Red, Forward Current=20mA, Forward Voltage=2V, Lens Color=Clear, Max Operating Temperature=85°C, Min Operating Temperature=-40°C, Package Quantity=2000, Case/Package=0603, Dominant Wavelength=625nm, Height=0.75mm, Illumination Color=Red, Lead Free="Lead Free", Length=1.6mm, Lens Style=Clear, Luminous Intensity=12mcd, Mount="Surface Mount", Number of LEDs=1, Number of Pins=2, Packaging="Tape and Reel", Test Current=20mA, Viewing Angle=120°, Wavelength=625nm, Width=0.8mm
D4: library part CMP-2000-05788-2, "LED BLUE CLEAR CHIP SMD", Case Code (Imperial)=0603, Case Code (Metric)=1608, Color=Blue, Forward Current=20mA, Forward Voltage=3.3V, Lens Color=Colorless, Max Operating Temperature=85°C, Min Operating Temperature=-40°C, Package Quantity=2000, Case/Package=0603, Dominant Wavelength=465nm, Height=0.75mm, Illumination Color=Blue, Lead Free="Lead Free", Length=1.6mm, Lens Style=Flat, Lens Transparency=Clear, Luminous Intensity=100mcd, Mount="Surface Mount", Number of LEDs=1, Number of Pins=2, Packaging="Tape and Reel", Test Current=20mA, Viewing Angle=120°, Width=0.8mm
FB1: library part CMP-06046-000201-1, "Chip Ferrite Bead, 0603, 220Ω @ 100MHz, 0.1Ω, 25%, 1.4A", Case Code (Imperial)=0603, Case Code (Metric)=1608, Current Rating=1.4A, DC Resistance (DCR)=100mR, Max Operating Temperature=125°C, Min Operating Temperature=-55°C, Package Quantity=4000, Ratings=AEC-Q200, Test Frequency=100MHz, Tolerance=25%, Case/Package=0603, Core Material=Ferrite, Depth=0.95mm, Height=0.037inch, Impedance=220R, Lead Free="Lead Free", Length=0.063inch, Max Current Rating=1.4A, Max DC Current=1.4A, Mount="Surface Mount", Number of Circuits=1, Number of Lines=1, Packaging="Tape and Reel", REACH SVHC="No SVHC", Termination=SMD/SMT, Width=0.8mm
J1: "Conector USB-C 2.0, receptáculo de 16 pinos, montagem SMT/TH", Manufacturer=GCT, Datasheet=https://gct.co/connector/usb4105, Manufacturer Part Number=USB4105-GF-A
J2: library part CMP-1502-01070-4, "THT Vertical Pin Header WR-PHD, Pitch 2.54 mm, Single Row, 6 pins", Color=Black, Contact Resistance=20mΩ, Current Rating=3A, Max Operating Temperature=105°C, Min Operating Temperature=-40°C, Operating Supply Voltage=250V, Connector Type="Male Pin", Contact Gender=Male, Contact Material=Gold, Contact Mating Length=5.9944mm, Contact Plating=Gold, Gender=Male, Height=8.89mm, Housing Material=PBT, Lead Free="Lead Free", Lead Pitch=2.54mm, Mount="Through Hole", Number of Contacts=6, Number of Pins=6, Number of Positions=6, Number of Rows=1, Orientation=Vertical, Packaging=Bulk, Pitch=2.54mm, RoHS=Compliant, Termination="Through Hole", Voltage Rating=250V
J3: library part CMP-1502-01064-4, "THT Vertical Pin Header WR-PHD, Pitch 2.54 mm, Single Row, 4 pins", Color=Black, Contact Resistance=20mΩ, Current Rating=3A, Max Operating Temperature=105°C, Min Operating Temperature=-40°C, Operating Supply Voltage=250V, Connector Type="Male Pin", Contact Material=Gold, Contact Mating Length=5.9944mm, Contact Plating=Gold, Gender=Male, Height=8.89mm, Lead Free="Lead Free", Lead Pitch=2.54mm, Mount="Through Hole", Number of Contacts=4, Number of Pins=4, Number of Positions=4, Number of Rows=1, Orientation=Vertical, Packaging=Bulk, Pitch=2.54mm, RoHS=Compliant, Termination=Solder, Voltage Rating=250V
J4: library part CMP-2000-05150-2, "CONN MICRO SD CARD PUSH-PUSH R/A", Current Rating=500mA, Flammability Rating="UL94 V-0", Max Operating Temperature=85°C, Max Voltage Rating (AC)=125V, Min Operating Temperature=-25°C, Package Quantity=1, Connector Type=Connector, Contact Material="Copper Alloy", Contact Plating=Gold, Depth=15.95mm, Gender=Female, Height=1.68mm, Housing Material=Polymer, Lead Free="Lead Free", Length=15.95mm, Max Current Rating=500mA, Mount="Surface Mount", Number of Contacts=8, Number of Positions=8, Number of Rows=1, Orientation="Right Angle", Packaging="Tape and Reel", Pitch=1.1mm, Radiation Hardening=No, REACH SVHC="No SVHC", Termination=SMD/SMT, Voltage Rating=125V, Width=13.85mm
L1: library part CMP-08253-000022-1, "FIXED IND 2.2UH 3.15A 106 MOHM", Inductance=2.2uH, Manufacturer=TDK, Package=VLS3012HBX, Rms Current=3.35A, Saturation Current=3.76A, Series Resistance=106mΩ, Temperature="-40°C to +105°C", Temperature Range High=+105°C, Temperature Range Low=-40°C, Test Frequency=1MHz, Tolerance=20%, Automotive=No, Category=Ind, ComponentLink2Description=Datasheet, ComponentLink2URL=https://product.tdk.com/info/en/catalog/datasheets/inductor_commercial_power_vls3012hbx_en.pdf, Composition=Wirewound, Core Material=Metal, Device Class L1="Passive Components", Device Class L2=Inductors, Device Class L3="Fixed Inductors", Digikey Description="FIXED IND 2.2UH 3.15A 106 MOHM", Height=1.2mm, Lead Free=Yes, Manufacturer Part Number=VLS3012HBX-2R2M, Octopart=https://octopart.com/vls3012hbx-2r2m-tdk-83930104, RoHS=TRUE, Shielding=true
L2: library part CMP-06042-014073-1, "Multilayer Type Inductor for Power Lines, 0805 (2012), 2.2μH, 20%, 0.156Ω, 1.7A", Case Code (Imperial)=0805, Case Code (Metric)=2012, Current Rating=1.3A, DC Resistance (DCR)=156mR, Inductance=2.2uH, Max Operating Temperature=85°C, Min Operating Temperature=-40°C, Package Quantity=3000, Saturation Current=450mA, Self Resonant Frequency=40MHz, Test Frequency=1MHz, Tolerance=20%, Case/Package=0805, Core Material=Ferrite, Height=0.9mm, Height - Seated (Max)=0.039inch, Length=0.079inch, Max DC Current=1.3A, Mount="Surface Mount", Packaging="Tape and Reel", Shielding=Shielded, Termination=SMD/SMT, Weight=0.000194oz, Width=0.049inch
P1: library part CMP-002-00031-2, "Male Header, Pitch 2 mm, 1 x 2 Position, Height 5.5 mm, -25 to 85 degC, RoHS, Tape and Reel", Case/Package=S2B-PH-SM4-TB(LF)(SN)-2, Manufacturer=JST, Max Operating Temperature=85°C, Min Operating Temperature=-25°C, Package Description="Male Header, Pitch 2 mm, 1 x 2 Position, Height 5.5 mm", Connector Type=Header, Datasheet URL=http://www.jst-mfg.com/product/pdf/eng/ePH.pdf, Datasheet Version=Dec-12, Gender=Male, Manufacturer URL=http://www.jst.com/home2.html, Mounting Technology=SM, Package Reference=S2B-PH-SM4-TB(LF)(SN)-2, RoHS Compliant=Unknown
Q1: library part CMP-12801-000021-1, "MOSFET P-CH 20V 4.2A SOT23", Continuous Drain Current=-4.2A, Drain To Source Breakdown Voltage=-20V, Drain To Source Resistance=40mΩ, Gate To Source Voltage=8V, Input Capacitace At Vds="808pF @ -15V", Manufacturer="Diodes Inc.", Max Junction Temp=+150°C, Package=SOT23, Power Dissipation=1.4W, Pulse Drain Current=-15A, Temperature="-55°C to +150°C", Temperature Range Low=-55°C, Automotive=No, Category=Trans, ComponentLink2Description=Datasheet, ComponentLink2URL=https://www.diodes.com/assets/Datasheets/DMG2305UX.pdf, Depletion Mode=False, Device Class L1="Discrete Semiconductors", Device Class L2=Transistors, Device Class L3=MOSFETs, Digikey Description="MOSFET P-CH 20V 4.2A SOT23", Drain To Source Voltage=-20V, Footprint Url=https://www.diodes.com/assets/Package-Files/SOT23.pdf, Gate Charge At Vgs="10.2nC @ -4.5V", Height=1.1mm, Ipc Land Pattern Name=SOT92P240X102-3, Lead Free=Yes, Manufacturer Part Number=DMG2305UX-13, Mouser Description="MOSFET P-Ch ENH FET -20V 52mOhm -5.0V", Number Of Channels=1, Number Of P Channels=1, Octopart=https://octopart.com/dmg2305ux-13-diodes+inc.-29925594, RoHS=TRUE, Rthja Max=90°C/W, Standoff Height=0.013mm, Temperature Range High=+150°C, Threshold Vgs Max=-0.9V, Threshold Vgs Min=-0.5V, Turn Off Delay Time=79.3ns, Turn On Delay Time=10.8ns
R1: library part CMP-2100-03663-2, Case Code (Imperial)=0603, Max Operating Temperature=155°C, Min Operating Temperature=-55°C, Power Rating=100mW, Resistance=100Ω, Temperature Coefficient=100ppm/°C, Tolerance=1%, Voltage Rating=50V, Case Code (Metric)=0603, Case/Package=0603, Composition="Thick Film", Depth=800µm, Height=450µm, Lead Free="Lead Free", Length=1.6mm, Military Standard=Not, NexarPartId=55402879, Number of Pins=2, Packaging="Tape & Reel", REACH SVHC=Unknown, RoHS=Compliant, Schedule B="8533210045, 8533210045", Termination=SMD/SMT, Voltage Rating (DC)=50V, Width=800µm
R2 R5 R6: library part CMP-2100-03662-2, "RES SMD 100K OHM 1% 1/10W 0603", Case Code (Imperial)=0603, Case Code (Metric)=1608, Max Operating Temperature=155°C, Max Power Dissipation=100mW, Min Operating Temperature=-55°C, Resistance=100kR, Resistance Tolerance=1%, Resistor Type="Thick Film", Temperature Coefficient=100ppm/°C, Voltage Rating=50V, Working Voltage=75V, Case/Package=0603, Construction=Rectangular, Depth=0.8mm, Features="Moisture Resistant", Height=0.45mm, Lead Free="Lead Free", Length=1.6mm, Military Standard=Not, Number of Pins=2, Number of Terminations=2, Packaging="Tape and Reel", Power Rating=100mW, REACH SVHC="No SVHC", RoHS Compliant=Yes, Series=RC, Technology="THICK FILM", Termination=SMD/SMT, Tolerance=1%, Voltage Rating (DC)=50V, Width=0.8mm
R3 R4: library part CMP-2000-04091-1, Manufacturer=Yageo, Part Number=RC0603FR-075K1L
R7 R18: library part CMP-2100-03664-2, "RES 10K OHM 1% 1/10W 0603", Case Code (Imperial)=0603, Case Code (Metric)=1608, Max Operating Temperature=155°C, Max Power Dissipation=100mW, Min Operating Temperature=-55°C, Resistance=10kR, Resistance Tolerance=1%, Resistor Type="Thick Film", Temperature Coefficient=100ppm/°C, Voltage Rating=75V, Voltage Rating (DC)=50V, Case/Package=0603, Construction=Rectangular, Depth=0.8mm, Features="Moisture Resistant", Height=0.45mm, Lead Free="Lead Free", Lead Pitch=0.3mm, Length=1.6mm, Military Standard=Not, Number of Pins=2, Number of Terminations=2, Packaging="Tape and Reel", Power Rating=100mW, RoHS Compliant=Yes, Series=RC, Size Code=0603, Termination=SMD/SMT, Tolerance=1%, Weight=7.1E-05oz, Width=0.8mm
R8 R9: library part CMP-2000-06942-1, "Chip Resistor, 4.7 KOhm, +/- 1%, 0.1 W, -55 to 155 degC, 0603 (1608 Metric), RoHS, Tape and Reel", Case Code - in=0603, Case Code - mm=1608, Manufacturer=Yageo, Operating Temperature Range=-55Cto+155C, Package Description="2-Pin Surface Mount Device, Body 1.6 x 0.8 mm", Power Rating=100mW, Resistance=4.7kOhms, Temperature Coefficient=100PPM/C, Tolerance=1%, Voltage Rating=50V, Datasheet URL=http://www.yageo.com/documents/recent/PYu-RC_Group_51_RoHS_L_7.pdf, Datasheet Version="Rev. 7, 05/2017", Manufacturer URL=http://www.yageo.com/, Mounting Technology=SurfaceMount, Package Reference=0603, Packaging=Reel, Product=ThickFilmResistorsGeneralPurpose, Series=RC, Termination Style=SMD/SMT
R10 R11 R12 R13 R14 R15: library part CMP-1659-00055-2, "RES SMD 47K OHM 1% 1/10W 0603", Case Code (Imperial)=0603, Case Code (Metric)=1608, Max Operating Temperature=155°C, Max Power Dissipation=100mW, Min Operating Temperature=-55°C, Package Quantity=1, Resistance=47kR, Resistance Tolerance=1%, Resistor Type="Thick Film", Temperature Coefficient=100ppm/°C, Voltage Rating=50V, Case/Package=0603, Construction=Rectangular, Depth=0.8mm, Features="Moisture Resistant", Height=0.022inch, Lead Free="Lead Free", Length=0.063inch, Military Standard=Not, Number of Pins=2, Number of Terminations=2, Packaging="Tape and Reel", Power Rating=100mW, RoHS Compliant=Yes, Series=RC, Size Code=0603, Technology="THICK FILM", Termination=SMD/SMT, Tolerance=1%, Voltage Rating (DC)=50V, Width=0.031inch
R16: library part CMP-2000-06939-1, "Chip Resistor, 33 Ohm, +/- 1%, 0.1 W, -55 to 155 degC, 0603 (1608 Metric), RoHS, Tape and Reel", Case Code - in=0603, Case Code - mm=1608, Manufacturer=Yageo, Operating Temperature Range=-55Cto+155C, Package / Case=0603(1608metric), Package Description="2-Pin Surface Mount Device, Body 1.6 x 0.8 mm", Power Rating=100mW, Resistance=33, Temperature Coefficient=100PPM/C, Tolerance=1%, Voltage Rating=75V, Brand=Yageo, Datasheet URL=http://www.yageo.com/documents/recent/PYu-RC_Group_51_RoHS_L_7.pdf, Datasheet Version="Rev. 7, 05/2017", Height=0.45mm, Length=1.6mm, Manufacturer URL=http://www.yageo.com/, Mounting Technology=SurfaceMount, Package Reference=0603, Packaging=Reel, Product=ThickFilmResistorsGeneralPurpose, Product Category=ThickFilmResistors, RoHS=True, Series=RC, Termination Style=SMD/SMT, Type=GeneralPurposeChipResistorSurfaceMount, Unit Weight=0.000071oz, Width=0.8mm
R17 R19: library part CMP-1659-00009-5, "RES 1K OHM 1% 1/10W 0603", Case Code (Imperial)=0603, Case Code (Metric)=1608, Max Operating Temperature=155°C, Max Power Dissipation=100mW, Min Operating Temperature=-55°C, Resistance=1kR, Resistance Tolerance=1%, Resistor Type="Thick Film", Temperature Coefficient=100ppm/°C, Voltage Rating=50V, Case/Package=0603, Construction=Rectangular, Contact Plating=Tin, Depth=0.8mm, Features="Moisture Resistant", Height=0.45mm, Lead Free="Lead Free", Length=1.6mm, Military Standard=Not, Number of Terminations=2, Packaging="Tape and Reel", Power Rating=100mW, Radiation Hardening=No, REACH SVHC="No SVHC", RoHS Compliant=Yes, Series=RC, Size Code=0603, Technology="THICK FILM", Termination=SMD/SMT, Tolerance=1%
R20: library part CMP-03412-006947-1, "RES SMD 330 OHM 1% 1/10W 0603", Manufacturer=Yageo, Package=RT0603, Power Rating=0.1W, Resistance=330Ω, Temperature="-55°C to +155°C", Temperature Coefficient="50 ppm/°C", Temperature Range High=+155°C, Temperature Range Low=-55°C, Tolerance=0.01, Voltage Rating=75V, Automotive=No, Category=Res, ComponentLink2Description=Datasheet, ComponentLink2URL=http://www.yageo.com/documents/recent/PYu-RT_1-to-0.01_RoHS_L_9.pdf, Composition="Thin Film", Device Class L1="Passive Components", Device Class L2=Resistors, Device Class L3="Chip SMD Resistors", Digikey Description="RES SMD 330 OHM 1% 1/10W 0603", Footprint Url=http://www.yageo.com/exep/pages/download/literatures/PYu-R_Mount_10.pdf, Height=0.55mm, Ipc Land Pattern Name=RESC16080X45, Lead Free=Yes, Manufacturer Part Number=RT0603FRE07330RL, Mouser Description="Res Thin Film 0603 330 Ohm 1% 0.1W(1/10W) ???}50ppm/???? Molded SMD Paper T/R", Octopart=https://octopart.com/rt0603fre07330rl-yageo-39844739, RoHS=TRUE, Series=RT
SW1: library part CMP-2000-06501-2, "SWITCH SLIDE SPDT 300MA 6V", Case/Package=100, Contact Current Rating=300mA, Contact Resistance=70mR, Max Operating Temperature=85°C, Max Voltage Rating (DC)=6V, Min Operating Temperature=-40°C, Package Quantity=1, Actuator Length=2mm, Actuator Material=Nylon, Actuator Type=Standard, Contact Material="Copper Alloy", Contact Plating=Silver, Current Rating=300mA, Electrical Life=5000Cycles, Housing Material=Nylon, Illumination Type=Non-Illuminated, Lead Free="Lead Free", Length=9mm, Max Current Rating=300mA, Mount="Surface Mount", Orientation="Right Angle", Packaging="Tape and Reel", Radiation Hardening=No, REACH SVHC="No SVHC", Switch Function=On-On, Switch Travel=2mm, Termination="Gull Wing", Throw Configuration=SPDT, Voltage Rating (DC)=6V
SW2 SW3 SW4: library part CMP-011-00000-2, "Tactile Switch, SPST-NO, 0.05 A, 12 V, -25 to 70 degC, 2-Pin SMD, RoHS, Tape and Reel", Case/Package=B3U-1000, Contact Current Rating=50mA, IP Rating=IP40, Manufacturer="Omron Electronic Components", Max Contact Resistance=100mohm, Max Operating Temperature=70°C, Max Voltage Rating (DC)=12V, Min Operating Temperature=-25°C, Operating Force=153gf, Package Description="2-Pin Surface Mount Device, Body 3 x 2.5 mm", Package Quantity=3500, Resistance=0.1Ohm, Contact Material=Silver, Current Rating=50mA, Datasheet URL=http://www.omron.com/ecb/products/pdf/en-b3u.pdf, Datasheet Version=Jan-15, Manufacturer URL=http://www.omron.com/, Max Current Rating=50mA, Mounting Technology=SM, Package Reference=B3U-1000, Packaging=TapeandReel, RoHS Compliant=True, Throw Configuration=SPST, Voltage Rating=12V, Voltage Rating (DC)=12V